# Altium PCB PCBHEXAPOD.PcbDoc
Units mm, origin at the board's own origin, x right, y up, seen from the top; angles counter-clockwise.
Board outline 48.01 x 61.98 mm, 4 copper layers (Top Layer, GND, 12VCC, Bottom Layer), stack 0.603 mm thick; 21 components, 18 nets, 148 pads, 7 vias.
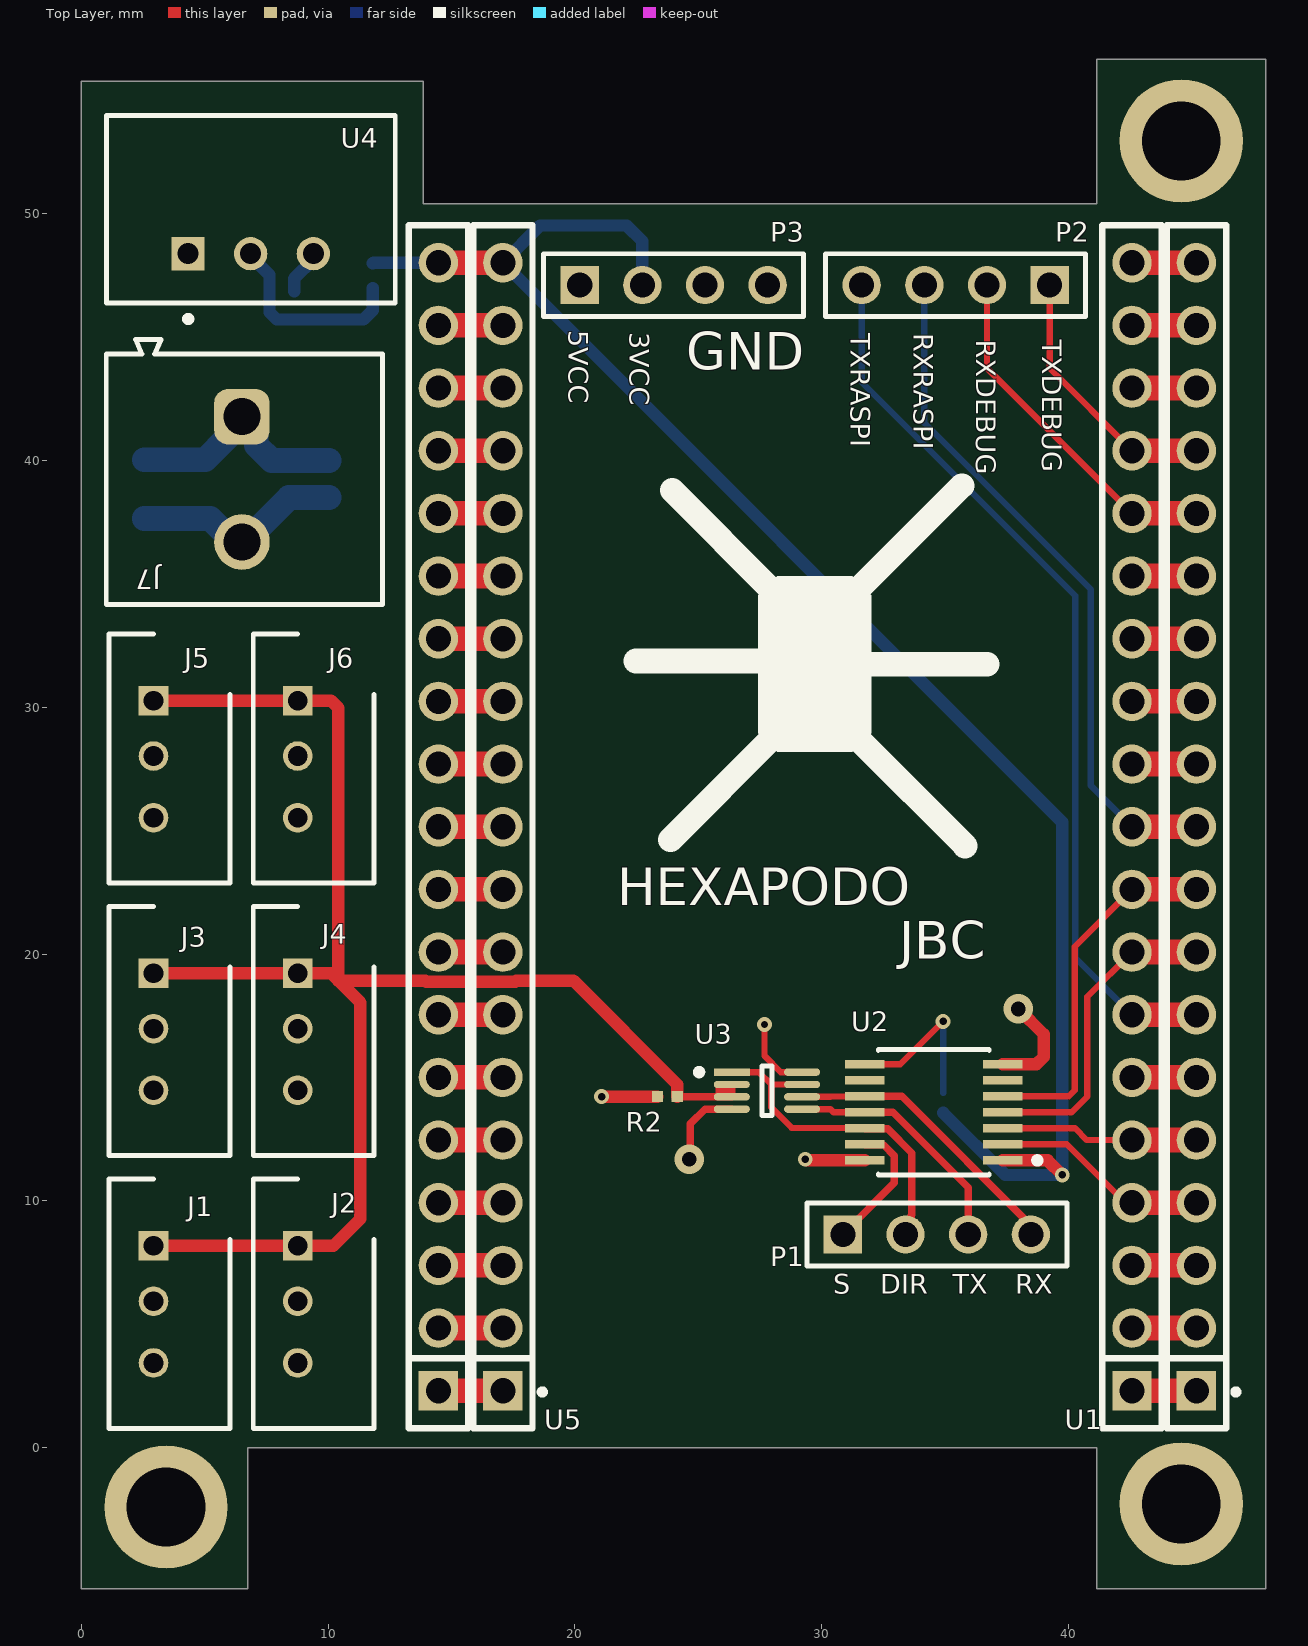
[diagram p0: Top Layer view]
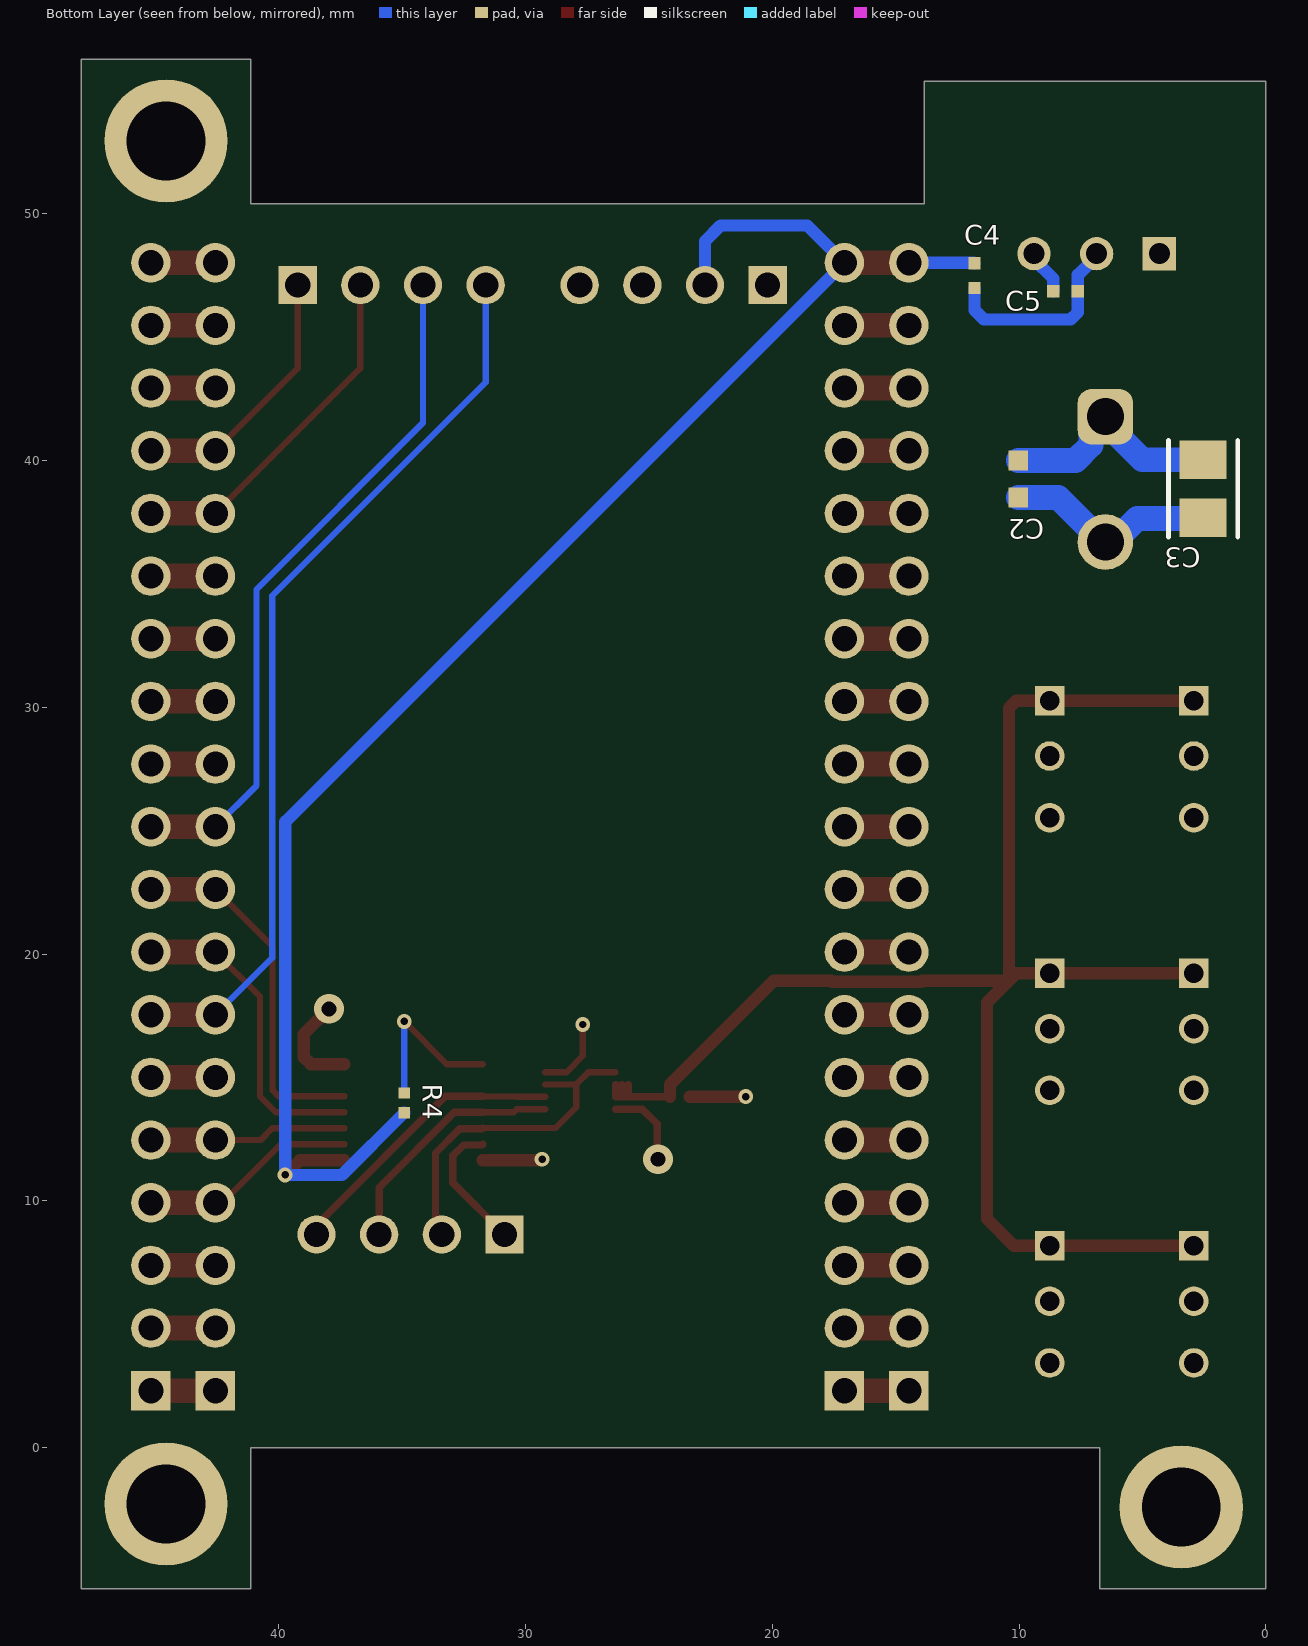
[diagram p1: Bottom Layer view, seen from below]
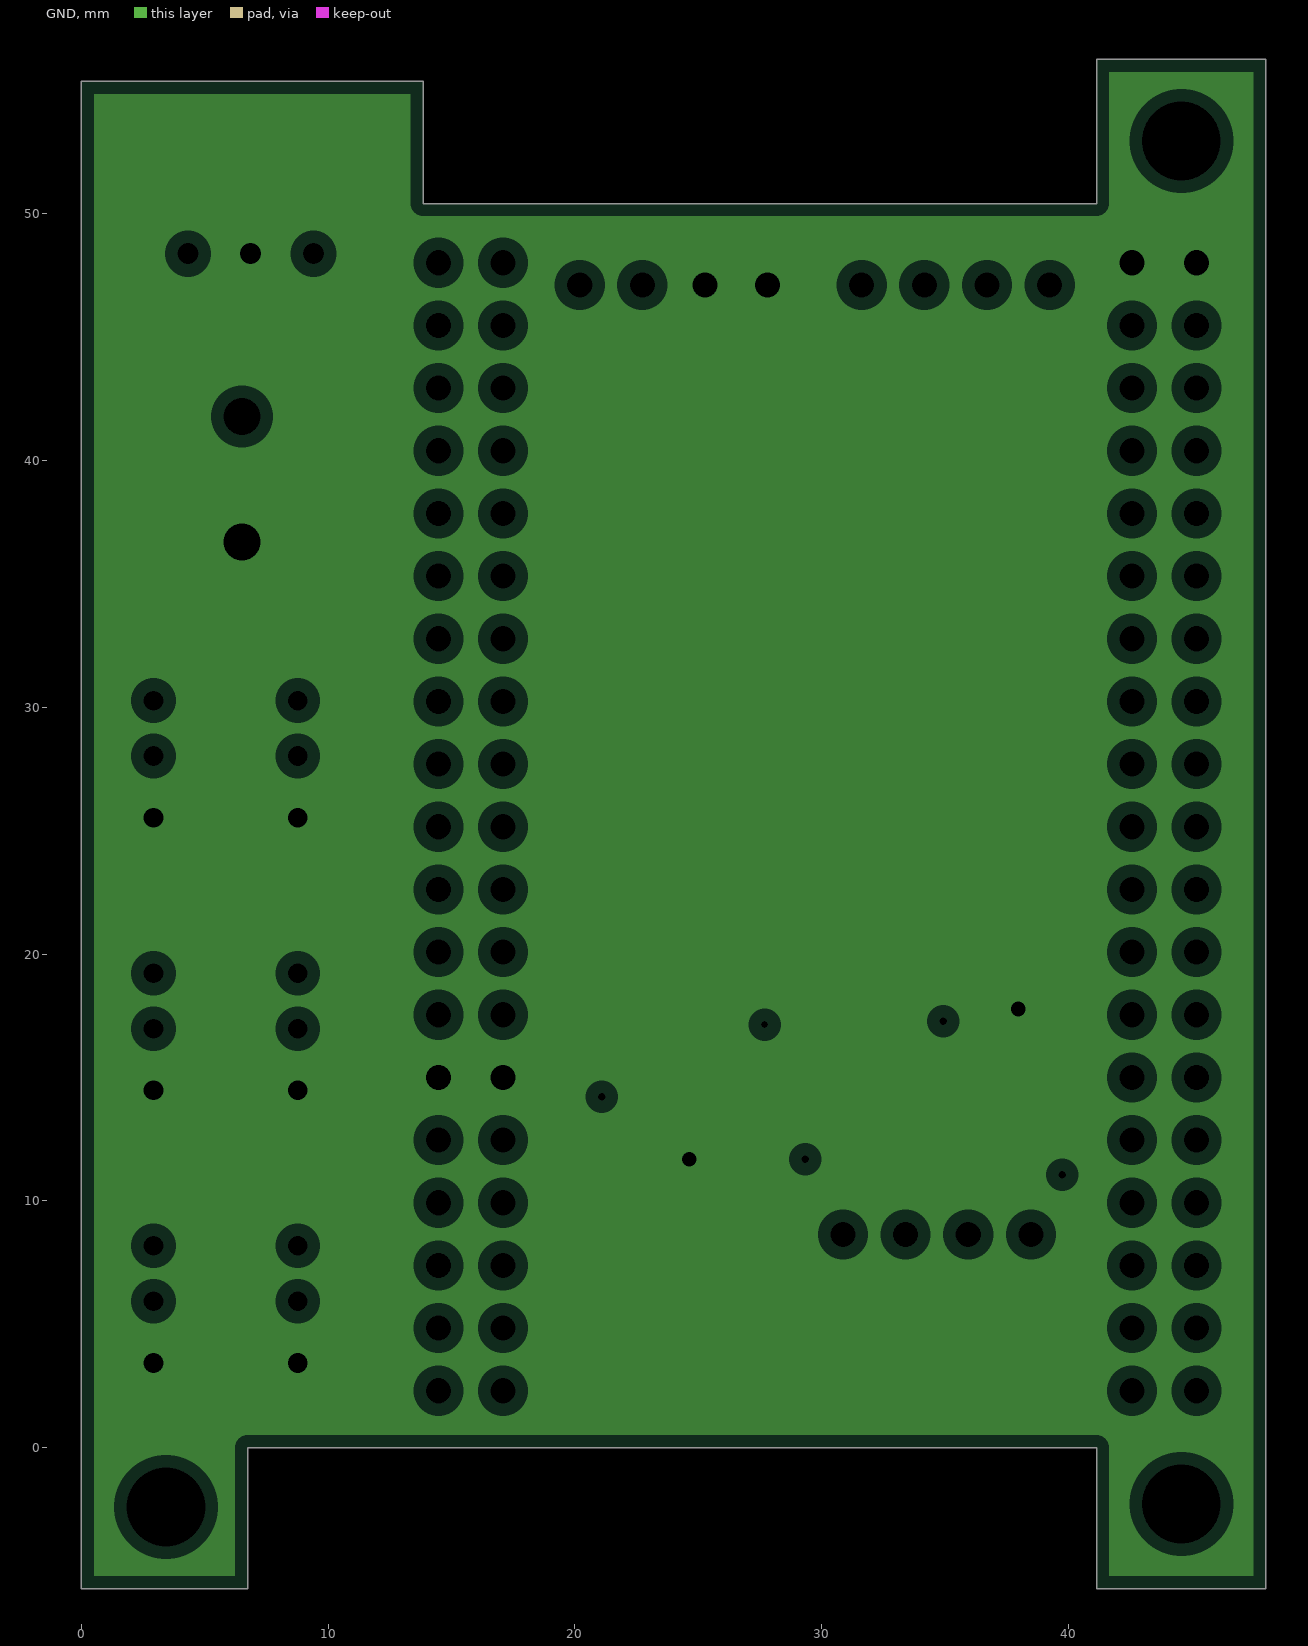
[diagram p2: GND, clearances drawn from the general rule]
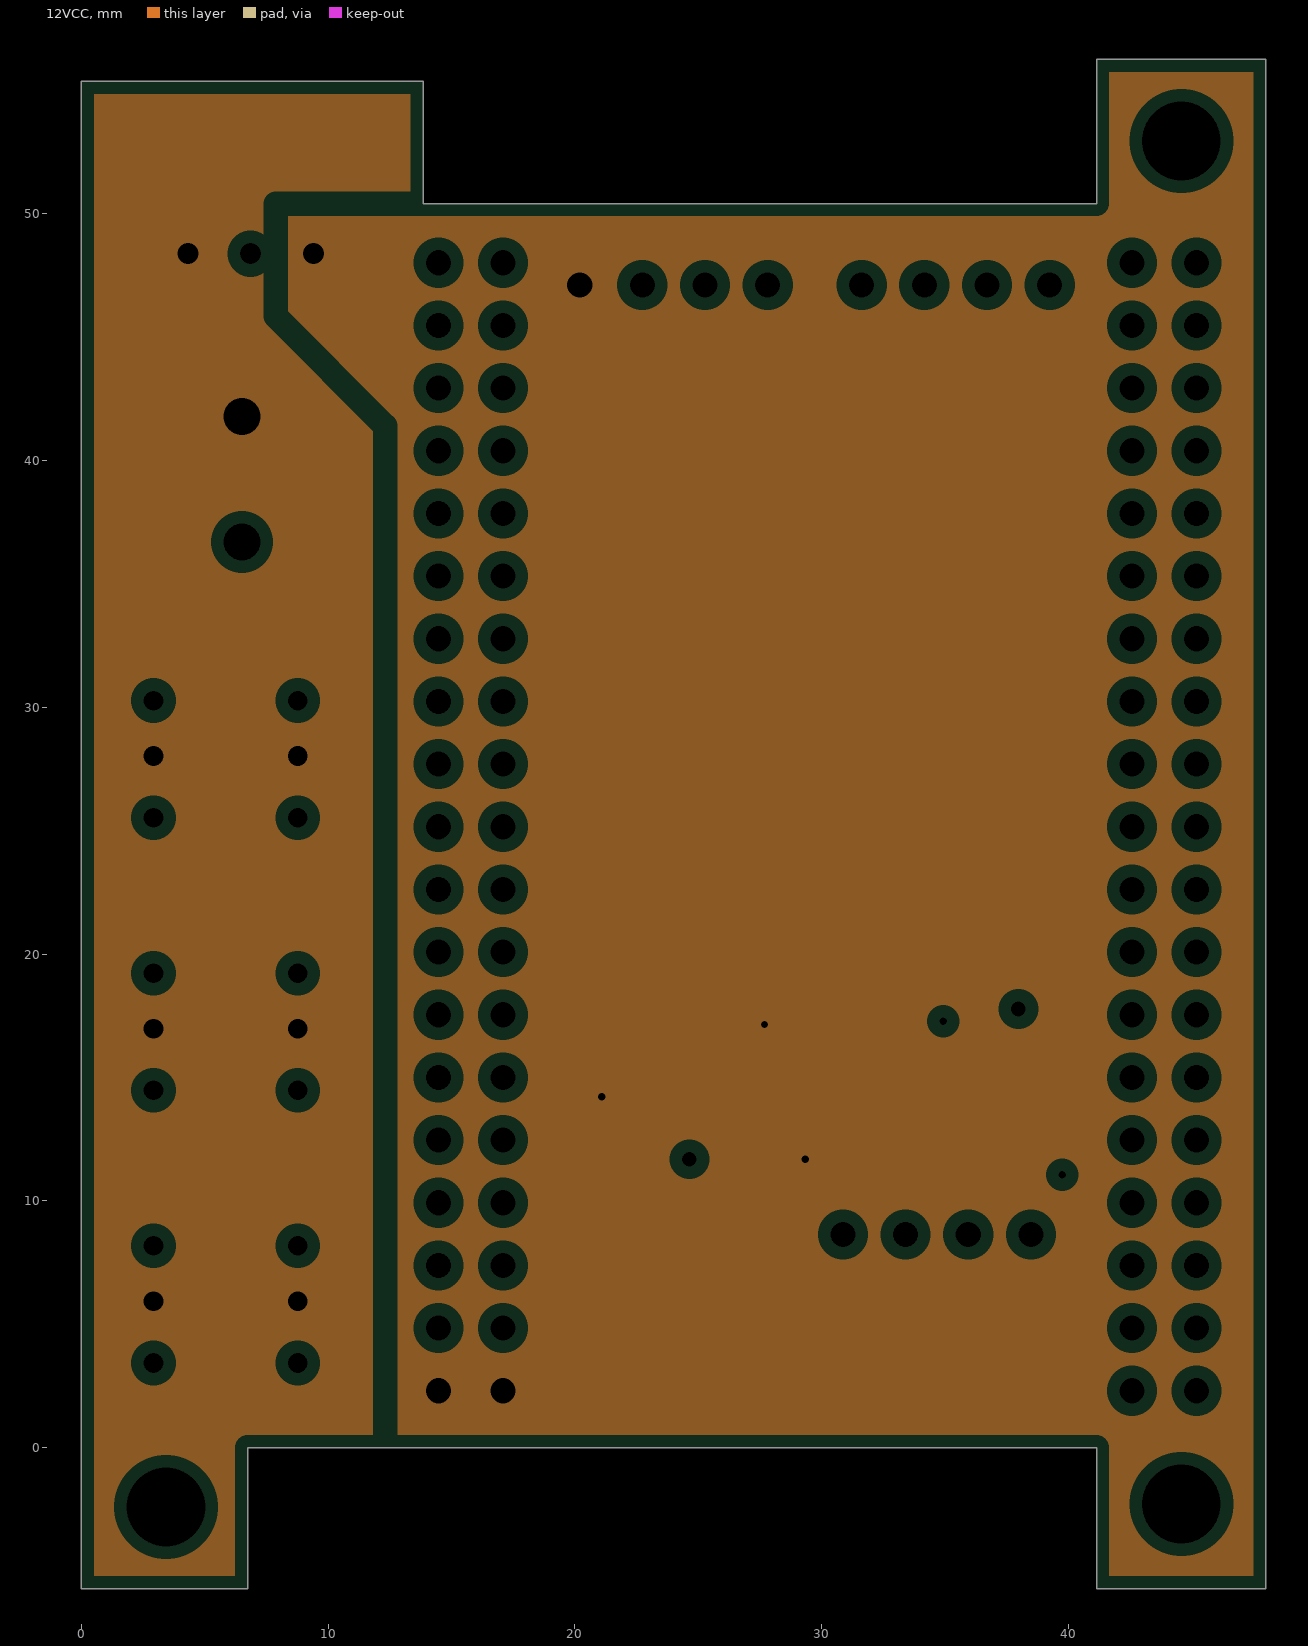
[diagram p3: 12VCC, clearances drawn from the general rule]

## Layer stack, top to bottom
Top Solder: solder mask 0.0102, Solder Resist, Dk 3.5
Top Layer: signal copper 0.0356
Dielectric 2: prepreg 0.0711, PP-006, Dk 4.1
GND: plane copper 0.035, net GND
Dielectric 1: dielectric 0.32, FR-4, Dk 4.8
12VCC: plane copper 0.035, net 5VCC
Dielectric 3: prepreg 0.0711, PP-006, Dk 4.1
Bottom Layer: signal copper 0.0356
Bottom Solder: solder mask 0.0102, Solder Resist, Dk 3.5

## Board outline
0,-5.715 6.731,-5.715 6.731,0 41.148,0 41.148,-5.715 48.006,-5.715 48.006,0 48.006,56.261 41.148,56.261 41.148,50.419 13.843,50.419 13.843,55.372 0,55.372

## Design rules (kind name [scope] priority, off if disabled: settings)
AssemblyTestPointUsage [All] p1: isadvanced=TRUE
AssemblyTestpoint [All] p1: isadvanced=TRUE testpointundercomponent=TRUE minsize=1.016 maxsize=2.54 preferedsize=1.524 minholesize=0 maxholesize=1.016 preferedholesize=0.813 testpointgrid=0.025 usegrid=TRUE gridtolerance=0 allowsidetop=TRUE allowsidebottom=TRUE
Clearance Clearance_1 [OnMid vs InNet('12VCC') And OnMid] p1: gap=0.25 ignorepadtopadclearanceinfootprint=FALSE sourcerule=56 cellrowname=All cellrowtype=0 cellcolname=12VCC cellcoltype=1 innerlayers=TRUE
Clearance Clearance_2 [(ExistsOnLayer('Top Layer') Or ExistsOnLayer('Bottom Layer')) vs InNet('12VCC') And (ExistsOnLayer('Top Layer') Or ExistsOnLayer('Bottom Layer'))] p2: gap=0.25 ignorepadtopadclearanceinfootprint=FALSE sourcerule=56 cellrowname=All cellrowtype=0 cellcolname=12VCC cellcoltype=1 outerlayers=TRUE
Clearance Clearance_3 [ vs InNet('12VCC')] p3: gap=0.254 ignorepadtopadclearanceinfootprint=FALSE sourcerule=56 cellrowname=All cellrowtype=0 cellcolname=12VCC cellcoltype=1
Clearance Clearance_1 [InNet('GND') And OnMid vs OnMid] p4: gap=0.15 ignorepadtopadclearanceinfootprint=FALSE sourcerule=56 cellrowname=GND cellrowtype=1 cellcolname=All cellcoltype=0 innerlayers=TRUE
Clearance Clearance_2 [InNet('GND') And (ExistsOnLayer('Top Layer') Or ExistsOnLayer('Bottom Layer')) vs (ExistsOnLayer('Top Layer') Or ExistsOnLayer('Bottom Layer'))] p5: gap=0.15 ignorepadtopadclearanceinfootprint=FALSE sourcerule=56 cellrowname=GND cellrowtype=1 cellcolname=All cellcoltype=0 outerlayers=TRUE
Clearance Clearance_3 [InNet('GND')] p6: gap=0.254 ignorepadtopadclearanceinfootprint=FALSE sourcerule=56 cellrowname=GND cellrowtype=1 cellcolname=All cellcoltype=0
Clearance Clearance_1 [OnMid vs OnMid] p7: gap=0.15 ignorepadtopadclearanceinfootprint=FALSE sourcerule=56 cellrowname=All cellrowtype=0 cellcolname=All cellcoltype=0 innerlayers=TRUE
Clearance Clearance_2 [(ExistsOnLayer('Top Layer') Or ExistsOnLayer('Bottom Layer')) vs (ExistsOnLayer('Top Layer') Or ExistsOnLayer('Bottom Layer'))] p8: gap=0.15 ignorepadtopadclearanceinfootprint=FALSE sourcerule=56 cellrowname=All cellrowtype=0 cellcolname=All cellcoltype=0 outerlayers=TRUE
Clearance [All] p9: gap=0.254 ignorepadtopadclearanceinfootprint=FALSE ismatrix=TRUE miname0=GND mitype0=1 miname1=12VCC mitype1=1
ComponentClearance [All] p1: isadvanced=TRUE gap=0.254 collisioncheckmode=3 verticalgap=0.254 showdistances=FALSE
FabricationTestPointUsage [All] p1: isadvanced=TRUE valid=0 allowmultiple=FALSE
FabricationTestpoint [All] p1: isadvanced=TRUE side=3 testpointundercomponent=TRUE minsize=1.016 maxsize=2.54 preferedsize=1.524 minholesize=0 maxholesize=1.016 preferedholesize=0.813 testpointgrid=0.025 allowsidetop=TRUE allowsidebottom=TRUE usegrid=TRUE gridtolerance=0
FanoutControl Fanout_BGA [IsBGA] p1: isadvanced=TRUE bgadir=Out bgaviamode=Centered fanoutstyle=Auto fanoutdirection=Alternating viagrid=0.025 // Fanout_BGA (Default Rule)
FanoutControl Fanout_LCC [IsLCC] p2: isadvanced=TRUE bgadir=Out bgaviamode=Centered fanoutstyle=Auto fanoutdirection=Alternating viagrid=0.025 // Fanout_LCC (Default Rule)
FanoutControl Fanout_SOIC [IsSOIC] p3: isadvanced=TRUE bgadir=Out bgaviamode=Centered fanoutstyle=Auto fanoutdirection=Alternating viagrid=0.025 // Fanout_SOIC (Default Rule)
FanoutControl Fanout_Small [(CompPinCount < 5)] p4: isadvanced=TRUE bgadir=Out bgaviamode=Centered fanoutstyle=Auto fanoutdirection=OutThenIn viagrid=0.025 // Fanout_Small (Default Rule)
FanoutControl Fanout_Default [All] p5: isadvanced=TRUE bgadir=Out bgaviamode=Centered fanoutstyle=Auto fanoutdirection=Alternating viagrid=0.025 // Fanout_Default (Default Rule)
Height [All] p1: isadvanced=TRUE minheight=0 maxheight=25.4 prefheight=12.7
HoleSize [All] p1: isadvanced=TRUE absolutevalues=TRUE maxlimit=6.3 minlimit=0.3 maxpercent=80.000 minpercent=20.000
HoleToHoleClearance [All] p1: isadvanced=TRUE gap=0.254 allowstackedmicrovias=TRUE
LayerPairs [All] p1: isadvanced=TRUE enforce=TRUE
MinimumSolderMaskSliver [All] p1: isadvanced=TRUE minsoldermaskwidth=0.1
NetAntennae [All] p1: isadvanced=TRUE netantennaetolerance=0
PasteMaskExpansion [All] p1: isadvanced=TRUE expansion=0
PlaneClearance [All] p1: isadvanced=TRUE clearance=0.508
PlaneConnect [All] p1: isadvanced=TRUE planeconnectstyle=Relief reliefexpansion=0.508 reliefentries=4 reliefconductorwidth=0.254 reliefairgap=0.254
PolygonConnect "Schematic Polygon Connect Style_1" [InNet('12VCC')] p1: connectstyle=Direct reliefconductorwidth=0.254 reliefentries=4 polygonreliefangle="90 Angle" airgapwidth=0.254
PolygonConnect "Schematic Polygon Connect Style" [InNet('GND')] p2: connectstyle=Direct reliefconductorwidth=0.254 reliefentries=4 polygonreliefangle="90 Angle" airgapwidth=0.254
PolygonConnect [All] p3: connectstyle=Relief reliefconductorwidth=0.254 reliefentries=4 polygonreliefangle="90 Angle" airgapwidth=0.254
RoutingCorners [All] p1: isadvanced=TRUE cornerstyle=45-Degree minsetback=2.54 maxsetback=2.54
RoutingPriority [All] p1: isadvanced=TRUE routingpriority=0
RoutingVias "Schematic Routing Via Style" [InNet('12VCC')] p1: holewidth=0.6 width=1.2 viastyle="Through Hole" minholewidth=0.6 minwidth=1.2 maxholewidth=0.6 maxwidth=1.2
RoutingVias "Schematic Routing Via Style_1" [InNet('GND')] p2: holewidth=0.6 width=1.2 viastyle="Through Hole" minholewidth=0.6 minwidth=1.2 maxholewidth=0.6 maxwidth=1.2
RoutingVias [All] p3: holewidth=0.3 width=0.6 viastyle="Through Hole" minholewidth=0.3 minwidth=0.6 maxholewidth=0.3 maxwidth=0.6
ShortCircuit [All] p1: isadvanced=TRUE allowed=FALSE
SilkToSilkClearance [All] p1: isadvanced=TRUE silktosilkclearance=0.1
SilkToSolderMaskClearance [IsPad] p1: isadvanced=TRUE minsilkscreentomaskgap=0.15 clearancetoexposedcopper=TRUE
SolderMaskExpansion [All] p1: isadvanced=TRUE expansion=0.102 istentingtop=FALSE
SupplyNets "Schematic Supply Nets_3" [InNet('3VCC')] p1: isadvanced=TRUE voltage=0.000
SupplyNets "Schematic Supply Nets_2" [InNet('12VCC')] p2: isadvanced=TRUE voltage=0.000
SupplyNets "Schematic Supply Nets_1" [InNet('5VCC')] p3: isadvanced=TRUE voltage=0.000
SupplyNets "Schematic Supply Nets" [InNet('GND')] p4: isadvanced=TRUE voltage=0.000
UnRoutedNet [All] p1: isadvanced=TRUE
UnpouredPolygon [All] p1: isadvanced=TRUE
Width "Schematic Width Constraint_5" [InNet('12VCC')] p1: maxlimit=5 minlimit=0.5 preferedwidth=1 minimp=50.000000 maximp=50.000000 favimp=50.000000
Width "Schematic Width Constraint_4" [InNet('GND')] p2: maxlimit=5 minlimit=0.3 preferedwidth=1 minimp=50.000000 maximp=50.000000 favimp=50.000000
Width "Schematic Width Constraint_2" [InNet('DATOS')] p3: maxlimit=5 minlimit=0.15 preferedwidth=0.5 minimp=50.000000 maximp=50.000000 favimp=50.000000
Width "Schematic Width Constraint_1" [InNet('5VCC')] p4: maxlimit=5 minlimit=0.254 preferedwidth=0.5 minimp=50.000000 maximp=50.000000 favimp=50.000000
Width "Schematic Width Constraint" [InNet('3VCC')] p5: maxlimit=5 minlimit=0.3 preferedwidth=0.5 minimp=50.000000 maximp=50.000000 favimp=50.000000
Width "Schematic Width Constraint_3" [InNetClass('POWER')] p6: maxlimit=5 minlimit=0.5 preferedwidth=1 minimp=50.000000 maximp=50.000000 favimp=50.000000
Width [All] p7: maxlimit=5 minlimit=0.15 preferedwidth=0.254 minimp=50.000000 maximp=50.000000 favimp=50.000000
4 further rules are at their usual default settings.

## Classes and differential pairs
net class POWER: 3VCC 5VCC 12VCC GND

## Components (designator, comment, footprint, x,y, rotation, side; value= is the part's Value field where it differs from the comment)
C2 "885012206076" WCAP-CSGP_0603_L1.6W0.8H0.8_Reflow 10.033,39.255 r90 bottom
C3 "GCJ31CD7YA106KE02L" FP-GCJ31C-0_4-IPC_C 2.54,38.862 r270 bottom
C4 "885012205037R" WCAP-CSGP_0402_L1W0.5H0.5 11.811,47.498 r90 bottom
C5 "885012205037R" WCAP-CSGP_0402_L1W0.5H0.5 8.12,46.863 r180 bottom
J1 "22-03-5035" SHDR3W60P0X250_1X3_990X490X590P 2.921,8.429 r90 top
J2 "22-03-5035" SHDR3W60P0X250_1X3_990X490X590P 8.763,8.429 r90 top
J3 "22-03-5035" SHDR3W60P0X250_1X3_990X490X590P 2.921,19.478 r90 top
J4 "22-03-5035" SHDR3W60P0X250_1X3_990X490X590P 8.763,19.478 r90 top
J5 "22-03-5035" SHDR3W60P0X250_1X3_990X490X590P 2.921,30.527 r90 top
J6 "22-03-5035" SHDR3W60P0X250_1X3_990X490X590P 8.763,30.527 r90 top
J7 "691253510002" 691253510002 6.604,39.243 r270 top
P1 "TSW-104-08-L-S" SMTC-TSW-104-08-X-S 30.861,8.636 r0 top
P2 "TSW-104-08-L-S" SMTC-TSW-104-08-X-S 39.243,47.117 r180 top
P3 "TSW-104-08-L-S" SMTC-TSW-104-08-X-S 20.193,47.117 r0 top
R2 "ERJ2RKF1002X" RESC1005X40X25LL05T05 23.749,14.224 r180 top
R4 "ERJ2RKF1002X" RESC1005X40X25LL05T05 34.925,13.97 r270 bottom
U1 "SSW-119-01-T-S" HDR-TH_ESW-119-37-S-S 45.374,25.163 r90 top
U2 "TXB0104PWR" Texas_Instruments_PW0014A_MFG 34.544,13.589 r180 top
U3 "SN74LVC2G241DCUT" FP-DCU0008A-IPC_A 27.784,14.466 r0 top
U4 "TSR 1-2450" TRACO-SIP-3_V 6.858,48.387 r0 top
U5 "SSW-119-01-T-S" HDR-TH_ESW-119-37-S-S 17.264,25.163 r90 top

## Footprints (in the part's own frame and the unit in brackets; to place one, negate y for a bottom-side part, rotate by r counter-clockwise, add the part's x,y. Pads: shape width x height; smd on the part's side, far side on the other; paste and mask are expansions set on the pad)
691253510002 [mm] "Serie 2535 - 5.08 mm _ 2 pins"
  rrect50% 2.25x2.25 hole 1.5: 1(-2.54,-0.1)
  round 2.25 hole 1.5: 2(2.54,-0.1)
  silkscreen extent -5.67,-5.6 5.08,5.6, body extent -5.67,-5.6 5.09,5.6, height 18.1
FP-DCU0008A-IPC_A [mm]
  rect 1.46x0.297 smd paste+0 mask+0: 1(-1.426,0.75)
  rrect100% 1.46x0.297 smd paste+0 mask+0: 2(-1.426,0.25) 3(-1.426,-0.25) 4(-1.426,-0.75) 5(1.426,-0.75) 6(1.426,-0.25) 7(1.426,0.25) 8(1.426,0.75)
  silkscreen extent -2.87,-1 0.2,1, body extent -2.66,-1.5 2.66,1.5, height 0.25
FP-GCJ31C-0_4-IPC_C [mm]
  rect 1.553x1.903 smd paste+0 mask+0: 1(-1.175,0) 2(1.175,0)
  silkscreen extent -1.95,-1.4 1.95,1.4, body extent -1.6,-0.8 1.6,0.8, height 2
HDR-TH_ESW-119-37-S-S [mm]
  rect 1.6x1.6 hole 1.02 paste-2539.97 mask+0.05: 1(-22.86,0.184) 1(-22.86,2.794)
  round 1.6 hole 1.02 paste-2539.97 mask+0.05: 2(-20.32,0.184) 2(-20.32,2.794) 3(-17.78,0.184) 3(-17.78,2.794) 4(-15.24,0.184) 4(-15.24,2.794) 5(-12.7,0.184) 5(-12.7,2.794) 6(-10.16,0.184) 6(-10.16,2.794) 7(-7.62,0.184) 7(-7.62,2.794) 8(-5.08,0.184) 8(-5.08,2.794) 9(-2.54,0.184) 9(-2.54,2.794) 10(0,2.794) 10(0,0.184) 11(2.54,0.184) 11(2.54,2.794) 12(5.08,0.184) 12(5.08,2.794) 13(7.62,0.184) 13(7.62,2.794) 14(10.16,0.184) 14(10.16,2.794) 15(12.7,0.184) 15(12.7,2.794) 16(15.24,0.184) 16(15.24,2.794) 17(17.78,0.184) 17(17.78,2.794) 18(20.32,0.184) 18(20.32,2.794) 19(22.86,0.184) 19(22.86,2.794)
  Top Layer lines w1: -22.86,2.794 -22.86,0.184 ; -20.32,2.794 -20.32,0.184 ; -17.78,2.794 -17.78,0.184 ; -15.24,2.794 -15.24,0.184 ; -12.7,2.794 -12.7,0.184 ; -10.16,2.794 -10.16,0.184 ; -7.62,2.794 -7.62,0.184 ; -5.08,2.794 -5.08,0.184 ; -2.54,2.794 -2.54,0.184 ; 0,2.794 0,0.184 ; 2.54,2.794 2.54,0.184 ; 5.08,2.794 5.08,0.184 ; 7.62,2.794 7.62,0.184 ; 10.16,2.794 10.16,0.184 ; 12.7,2.794 12.7,0.184 ; 15.24,2.794 15.24,0.184 ; 17.78,2.794 17.78,0.184 ; 20.32,2.794 20.32,0.184 ; 22.86,2.794 22.86,0.184
  silkscreen extent -24.38,-1.52 24.38,4, body extent -23.88,-1.14 24.38,4.01, height 8.5
RESC1005X40X25LL05T05 [mm] "Chip Resistor, 2-Leads, Body 1.05x0.55mm, IPC High Density"
  rect 0.45x0.45 smd: 1(-0.4,0) 2(0.4,0)
  body extent -0.53,-0.28 0.53,0.28, height 0.4
SHDR3W60P0X250_1X3_990X490X590P [mm]
  rect 1.2x1.2 / inner round 1.2 / far side rect 1.2x1.2 hole 0.8: 1(-0.254,0)
  round 1.2 hole 0.8: 2(-2.5,0) 3(-5,0)
  silkscreen extent -7.65,-3.1 2.45,1.8, body extent -7.7,-3.1 2.2,1.8, height 5.8
SMTC-TSW-104-08-X-S [mm] ".025 SQ Post Terminal Strip Assembly, 1x4 Pins, Vertical, 2.54mm Pitch, Male"
  rect 1.55x1.55 hole 1.02: 1(0,0)
  round 1.55 hole 1.02: 2(2.54,0) 3(5.08,0) 4(7.62,0)
  silkscreen extent -1.46,-1.27 9.08,1.27, body extent -1.27,-1.27 8.89,1.27, height 8.38
Texas_Instruments_PW0014A_MFG [mm]
  rect 1.6x0.35 smd paste-1000 mask+0: 1(-2.8,1.95) 2(-2.8,1.3) 3(-2.8,0.65) 4(-2.8,0) 5(-2.8,-0.65) 6(-2.8,-1.3) 7(-2.8,-1.95) 8(2.8,-1.95) 9(2.8,-1.3) 10(2.8,-0.65) 11(2.8,0) 12(2.8,0.65) 13(2.8,1.3) 14(2.8,1.95)
  silkscreen extent -4.33,-2.55 2.25,2.55, body extent -3.7,-2.8 3.7,2.8, height 0.25
TRACO-SIP-3_V [mm] "SIP, 3-Leads, Body 11.7x7.6mm, Pitch 2.54mm"
  rect 1.35x1.35 hole 0.85 paste-2539.97: 1(-2.54,0)
  round 1.35 hole 0.85 paste-2539.97: 2(0,0) 3(2.54,0)
  silkscreen extent -5.84,-2.77 5.86,5.6, body extent -5.84,-2 5.86,5.6, height 10.2
WCAP-CSGP_0402_L1W0.5H0.5 [mm] "Ceramic Capacitors, body 1x0.5mm"
  rect 0.5x0.5 smd: 1(-0.5,0) 2(0.5,0)
  body extent -0.5,-0.25 0.5,0.25, height 0.5
WCAP-CSGP_0603_L1.6W0.8H0.8_Reflow [mm] "Ceramic Capacitors, body 1.6x0.8mm"
  rect 0.8x0.8 smd: 1(-0.75,0) 2(0.75,0)
  body extent -0.8,-0.4 0.8,0.4, height 0.8

## Part data
C2: library part CMP-03913-53914785-2, "1UF Multilayer Ceramic Capacitor Mlcc 25 V , X7R Dielectric 0603 Surface Mount", Capacitance=1µF, Case Code (Imperial)=0603, Case Code (Metric)=1608, Dielectric=X7R, Insulation Resistance=500MΩ, Max Operating Temperature=125°C, Min Operating Temperature=-55°C, Tolerance=10%, Voltage Rating=25V, Case/Package=0603, Height=800µm, Length=1.6mm, Material=Ceramic, Mount="Surface Mount", REACH SVHC=Unknown, RoHS=Compliant, Thickness=939.8µm, Voltage Rating (DC)=25V, Width=800µm
C3: library part CMP-06035-004889-1, "Cap Ceramic 10uF 35V X7T 10% SMD 1206 +125°C Embossed Plastic T/R"
C4 C5: library part CMP-03913-130590225-1, "Cap, 0.1Uf, 16V, Mlcc, 0402 Rohs Compliant: Yes", Capacitance=100nF, Insulation Resistance=5GΩ, Max Operating Temperature=125°C, Min Operating Temperature=-55°C, Voltage Rating=16V, Height=500µm, Length=1mm, RoHS=Compliant, Width=500µm
J1 J2 J3 J4 J5 J6: "Header 2.5mm SPOX,WTB,vert, shrouded, 3w Molex SPOX Series, Series Number 5267, 2.5mm Pitch 3 Way 1 Row Straight PCB Header, Solder Termination, 3A", Manufacturer_Name=Molex, Mouser Part Number=538-22-03-5035, Datasheet Link=http://www.molex.com/pdm_docs/sd/022035035_sd.pdf, Geometry.Height=5.9mm, Manufacturer_Part_Number=22-03-5035, Mouser Price/Stock=https://www.mouser.co.uk/ProductDetail/Molex/22-03-5035?qs=VKrXD49J9Ep%252Bv2WwbOoiPA%3D%3D
J7: library part CMP-1502-02670-3, "Terminal Block, Wtb, 2Way, 30-12Awg Rohs Compliant: Yes", Current Rating=16A, Max Operating Temperature=120°C, Min Operating Temperature=-30°C, Voltage Rating=300V, Contact Material="Nickel, Tin", Height=18.1mm, Number Of Contacts=2, Number of Rows=1, RoHS=Compliant
P1 P2 P3: library part CMP-1024-00358-1, "0.025\" SQ Post Header, Through-hole, Vertical, -55 to 125 degC, 2.54 mm Pitch, 4-Pin, Male, RoHS", Manufacturer=Samtec, Temperature Range="-55 to 125 degC", ComponentLink1Description="Manufacturer URL", ComponentLink1URL=http://www.samtec.com, ComponentLink2Description=Datasheet, ComponentLink2URL=http://www.samtec.com/documents/webfiles/pdf/TSW_TH.PDF, ComponentLink3Description="Package Specification", ComponentLink3URL=http://www.samtec.com/documents/webfiles/cpdf/TSW-XXX-XX-XXX-X-XX-XXX-MKT.pdf, DatasheetVersion=F-214, Mounting Technology=Through-hole, Orientation=Vertical, PackageDescription=".025[0.64] SQ. Post Terminal Strip Assembly", PackageReference=TSW-104-08-X-S, PackageVersion="DM, 8/1988", PartNumber=TSW-104-08-L-S, Pitch="2.54 mm", RoHS=True
R2 R4: library part CMP-2000-07588-1, "Chip Resistor, 10 KOhm, +/- 1%, 0.1 W, -55 to 155 degC, 0402 (1005 Metric), RoHS, Tape and Reel", Case Code (Imperial)=0402, Case Code (Metric)=1005, Manufacturer=Panasonic, Max Operating Temperature=155degC, Max Power Dissipation=100mW, Min Operating Temperature=-55degC, Package Description="2-Pin Surface Mount Device, Body 1 x 0.5 mm", Package Quantity=1, Package Reference=402, Resistance=10KOhm, Temperature Coefficient=100ppm\/degreesC, Tolerance=1%, Voltage Rating=50V, Case\/Package=0402, Composition=ThickFilm, Contact Plating=Tin, Datasheet URL=https://industrial.panasonic.com/cdbs/www-data/pdf/RDA0000/AOA0000C304.pdf, Datasheet Version=02/2017, Depth=0.5mm, Height=0.35mm, Lead Free=LeadFree, Length=1mm, Manufacturer URL=http://www.panasonic.com/, Military Standard=Not, Mount=SurfaceMount, Mounting Technology=SurfaceMount, Number of Pins=2, Number of Terminations=2, Packaging=TapeandReel, Power Rating=100mW, Radiation Hardening=No, REACH SVHC=NoSVHC, RoHSCompliant=True, Termination=SMD/SMT, Voltage Rating (DC)=50V, Width=0.02inch
U2: library part CMP-2000-07335-2, Ambient Temperature Range High=85°C, Case/Package=TSSOP, High Level Output Current=-20µA, Low Level Output Current=20µA, Manufacturer Lifecycle Status=ACTIVE, Max Junction Temperature (Tj)=150°C, Max Supply Voltage=5.5V, Min Operating Temperature=-40°C, Min Supply Voltage=1.2V, Nominal Supply Current=5µA, Quiescent Current=3.5µA, Data Rate=100Mbps, Height=1.2mm, Lead Free="Lead Free", Length=5mm, Lifecycle Status=Production, Logic Function=Translator, Max Operating Temperature=85°C, Min Supply Voltage (DC)=1.2V, Mount="Surface Mount", NexarPartId=1486292, Number of Bits=4, Number of Channels=4, Number of Circuits=1, Number of Inputs=4, Number of Outputs=4, Number of Pins=14, Output Current=20µA, Packaging=Digi-Reel®, Propagation Delay=4ns, Radiation Hardening=No, REACH SVHC="No SVHC", Rise Time=700ps, RoHS=Compliant, Schedule B="8542390000, 8542390000", Thickness=1mm, Turn-On Delay Time=31ns, Weight=57.209338mg, Width=4.4mm
U3: library part CMP-0859-00583-4, "IC BUFFER NON-INVERT 5.5V US8", Case/Package=VSSOP, High Level Output Current=-32mA, Low Level Output Current=32mA, Max Operating Temperature=125°C, Max Supply Voltage=5.5V, Min Operating Temperature=-40°C, Min Supply Voltage=1.65V, Package Quantity=250, Quiescent Current=10uA, Contact Plating=Gold, Lead Free="Lead Free", Logic Function=Buffer, Mount="Surface Mount", Number of Bits=2, Number of Bits per Element=1, Number of Channels=2, Number of Elements=2, Number of Gates=2, Number of Input Lines=2, Number of Inputs=2, Number of Output Lines=2, Number of Outputs=2, Number of Pins=8, Output Type=3-STATE, Packaging="Tape and Reel", Polarity=Non-Inverting, Propagation Delay=3.7ns, Radiation Hardening=No, REACH SVHC="No SVHC", RoHS Compliant=Yes, Series=74LVC, Technology=CMOS, Termination=SMD/SMT, Turn-On Delay Time=12.5ns
U4: library part CMP-2000-05427-1, "DC/DC converter, 5 VDC, 1000 mA, -40 to 85 degC, 3-Pin SIP, RoHS", Input Voltage DC Max=36V, Input Voltage DC Min=6.5V, Manufacturer=Tracopower, Output Current Max=1A, Output Power Max=5W, Output Voltage Nom.=5V, Package Description="3-Pin Single In-line Package, Body 11.7 x 7.6 mm, Pitch 2.54 mm", Package Reference=SIP-3, Approvals & Standards=IEC,UL, Datasheet URL=https://datasheet.ciiva.com/6815/tsr1-6815641.pdf, Datasheet Version=Jan-15, DC / DC Converter Mounting=ThroughHole, DC / DC Converter Output Type=Fixed, DC / DC Converter Type=SIP, Depth=11.7mm, Height=10.2mm, Manufacturer URL=http://www.tracopower.com/home, No. of Outputs=1Output, Product Range=TSR-1Series, Width=7.6mm

## Free pads (board coordinates)
  round 5 hole 3.2: 6(3.429,-2.413) 6(44.577,-2.286) 6(44.577,52.959)

## Via types
v1: diameter 0.6, hole 0.3, Top Layer to Bottom Layer, 5 vias
v2: diameter 1.2, hole 0.6, Top Layer to Bottom Layer, 2 vias

## Nets (pads, with @x,y where several pads share a name; then routed paths per layer and width w, separated by ;. In a path a pad name is that pad's centre, name@x,y a point inside that pad or via, vN(x,y) a via of type N, cw(c..) or ccw(c..) an arc to the next point about the centre after c; other vN are vias at no path point)
3VCC: C4.2 P3.2 R4.2 U2.1 U5.19 | length 65.9
  Top Layer w0.5: U2.1 39.161,11.639 v1(39.751,11.049)
  Bottom Layer w0.5: C4.2 11.836,48.023 U5.19@14.47,48.023 ; P3.2 22.733,48.895 22.098,49.53 18.587,49.53 17.08,48.023 39.605,25.499 39.751,25.352 v1(39.751,11.049) 37.446,11.049 R4.2
5VCC: C5.1 P3.1 R2.2 U2.14 U3.8 U4.3 U5.1 | length 9.6
  Top Layer w0.254: v1(27.686,17.145) 27.686,15.875 28.345,15.216 U3.8
  Top Layer w0.5: v1(21.082,14.224) R2.2 ; v1(29.337,11.684) 29.364,11.684 29.409,11.639 U2.14
  Bottom Layer w0.5: C5.1 8.62,47.379 9.398,48.157 U4.3
12VCC: C2.2 C3.1 J1.2 J2.2 J3.2 J4.2 J5.2 J6.2 J7.1 U4.1 | length 9.6
  Bottom Layer w1: C3.1 5.009,40.037 5.918,40.945 5.918,41.197 J7.1 ; J7.1@6.22,41.499 6.754,41.499 7.09,41.163 7.09,40.629 7.715,40.005 C2.2
DATOS: J1.1 J2.1 J3.1 J4.1 J5.1 J6.1 R2.1 U3.2 U3.3 | length 64.8
  Top Layer w0.3: R2.1 U3.3@26.289,14.224 ; U3.3@25.85,14.216 U3.2@25.85,14.716 ; U3.3@26.104,14.216 U3.2@26.104,14.716 ; U3.3 U3.2
  Top Layer w0.5: J1.1 J2.1 10.207,8.175 11.303,9.271 11.303,18.034 10.414,18.923 ; J3.1 J4.1 10.113,19.224 10.414,18.923 ; J5.1 J6.1 10.113,30.273 10.414,29.972 10.414,18.923 ; R2.1 24.149,14.713 19.939,18.923 17.617,18.923 17.577,18.883 13.973,18.883 13.933,18.923 10.414,18.923
DIR3V3: U1.5 U2.3 | length 5.4
  Top Layer w0.254: U2.3 40.274,12.939 40.75,12.463 U1.5@42.58,12.463
DIR5V5: P1.2 U2.12 U3.1 U3.7 | length 13.9
  Top Layer w0.254: U3.1 27.456,15.216 27.954,14.718 ; U3.7 27.956,14.716 27.954,14.718 ; U2.12 U2.12@31.792,12.891 ; U2.12@31.744,12.954 28.789,12.954 27.954,13.789 27.954,14.718
  Top Layer w0.3: U2.12 31.769,12.914 32.679,12.914 33.655,11.938 33.655,9.437 33.64,9.422 33.64,8.875 P1.2
GND: C2.1 C3.2 C4.1 C5.2 J1.3 J2.3 J3.3 J4.3 J5.3 J6.3 J7.2 P3.3 P3.4 U1.19 U2.7 U3.4 U4.2 U5.6 | length 24.2
  Top Layer w0.3: v2(24.638,11.684) 24.676,11.722 24.676,13.119 25.273,13.716 U3.4
  Top Layer w0.5: U2.7 38.709,15.539 39.002,15.832 39.002,16.751 v2(37.973,17.78)
  Bottom Layer w0.5: U4.2 6.858,48.292 7.62,47.53 7.62,46.013 7.913,45.72 11.43,45.72 11.811,46.101 C4.1
  Bottom Layer w1: C3.2@2.54,37.654 5.214,37.654 6.166,36.703 J7.2 6.612,36.703 8.414,38.505 C2.1
NetR4_1: R4.1 U2.8 | length 6.8
  Top Layer w0.254: U2.8 33.192,15.539 v1(34.925,17.272)
  Bottom Layer w0.254: R4.1 v1(34.925,17.272)
RX3V3: U1.9 U2.5 | length 12.1
  Top Layer w0.254: U2.5 40.02,14.239 40.259,14.478 40.259,20.302 U1.9@42.58,22.623
RX5V5: P1.4 U2.10 U3.6 | length 11.8
  Top Layer w0.254: U3.6 29.214,14.22 30.349,14.22 30.361,14.232 31.737,14.232 U2.10
  Top Layer w0.3: U2.10 33.259,14.239 38.481,9.017 P1.4
RXDEBUG: P2.2 U1.15 | length 11.7
  Top Layer w0.254: P2.2 36.703,43.74 U1.15@42.58,37.863
RXRASPI: P2.3 U1.10 | length 25.4
  Bottom Layer w0.254: P2.3 34.163,41.529 40.91,34.782 40.91,26.833 U1.10@42.58,25.163
SEÑAL3V3: U1.4 U2.2 | length 6.2
  Top Layer w0.254: U2.2 39.933,12.289 42.299,9.923 U1.4@42.58,9.923
SEÑAL5V5: P1.1 U2.13 | length 5.5
  Top Layer w0.3: P1.1 32.951,10.726 32.951,11.831 32.518,12.264 31.769,12.264 U2.13
TX3V3: U1.8 U2.4 | length 10.3
  Top Layer w0.254: U2.4 40.132,13.589 40.767,14.224 40.767,18.27 U1.8@42.58,20.083
TX5V5: P1.3 U2.11 U3.5 | length 10
  Top Layer w0.254: U3.5 29.218,13.708 30.361,13.708 30.48,13.589 U2.11
  Top Layer w0.3: U2.11 32.893,13.589 35.941,10.541 P1.3
TXDEBUG: P2.1 U1.16 | length 8.1
  Top Layer w0.254: P2.1 39.243,43.74 U1.16@42.58,40.403
TXRASPI: P2.4 U1.7 | length 34.1
  Bottom Layer w0.254: P2.4 31.623,43.18 40.278,34.525 40.278,19.845 U1.7@42.58,17.543
pads on no net: U1.1 U1.2 U1.3 U1.6 U1.11 U1.12 U1.13 U1.14 U1.17 U1.18 U2.6 U2.9 U5.2 U5.3 U5.4 U5.5 U5.7 U5.8 U5.9 U5.10 U5.11 U5.12 U5.13 U5.14 U5.15 U5.16 U5.17 U5.18

## Polygon pours and split planes (outlines as drawn)
GND on GND (split plane): 47.496,0 47.496,-5.205 41.658,-5.205 41.658,0 41.649,0.1 41.62,0.195 41.572,0.284 41.509,0.361 41.432,0.424 41.343,0.472 41.248,0.501 41.148,0.51 6.731,0.51 6.631,0.501 6.536,0.472 6.447,0.424 6.37,0.361 6.307,0.284 6.259,0.195 6.23,0.1 6.221,0 6.221,-5.205 0.51,-5.205 0.51,54.862 13.333,54.862 13.333,50.419 13.342,50.319 13.371,50.224 13.419,50.135 13.482,50.058 13.559,49.995 13.648,49.947 13.743,49.918 13.843,49.909 41.148,49.909 41.248,49.918 41.343,49.947 41.432,49.995 41.509,50.058 41.572,50.135 41.62,50.224 41.649,50.319 41.658,50.419 41.658,55.751 47.496,55.751
12VCC on 12VCC (split plane): 13.333,50.921 7.874,50.921 7.776,50.912 7.682,50.883 7.595,50.837 7.519,50.774 7.456,50.698 7.41,50.611 7.381,50.517 7.372,50.419 7.372,45.847 7.381,45.749 7.41,45.655 7.456,45.568 7.519,45.492 11.817,41.194 11.817,0.51 6.731,0.51 6.631,0.501 6.536,0.472 6.447,0.424 6.37,0.361 6.307,0.284 6.259,0.195 6.23,0.1 6.221,0 6.221,-5.205 0.51,-5.205 0.51,54.862 13.333,54.862
5VCC on 12VCC (split plane): 47.496,0 47.496,-5.205 41.658,-5.205 41.658,0 41.649,0.1 41.62,0.195 41.572,0.284 41.509,0.361 41.432,0.424 41.343,0.472 41.248,0.501 41.148,0.51 12.821,0.51 12.821,41.402 12.812,41.5 12.783,41.594 12.737,41.681 12.674,41.757 8.376,46.055 8.376,49.917 13.761,49.917 13.843,49.909 41.148,49.909 41.248,49.918 41.343,49.947 41.432,49.995 41.509,50.058 41.572,50.135 41.62,50.224 41.649,50.319 41.658,50.419 41.658,55.751 47.496,55.751

## Other copper
12VCC (plane layer: these items are gaps in the copper):
  lines w1: 12.319,0 12.319,41.402 7.874,45.847 7.874,50.419 12.573,50.419 14.097,50.419

## Silkscreen, mask and mechanical layers (free items; w line width, h text height)
Top Overlay:
  region: 28.194,35.306 31.242,35.306 32.004,34.544 32.004,28.956 31.242,28.194 28.194,28.194 27.432,28.956 27.432,34.544
  lines w1: 22.479,31.877 27.559,31.877 ; 23.876,24.638 28.067,28.829 ; 23.939,38.798 28.067,34.671 ; 31.242,34.544 35.687,38.989 ; 31.559,28.639 35.814,24.384 ; 31.623,31.75 36.703,31.75
  text "5VCC" at 19.758,45.292 h0.8 r270
  text "3VCC" at 22.225,45.212 h0.8 r270
  text "TXRASPI" at 31.188,45.165 h0.8 r270
  text "RXRASPI" at 33.728,45.165 h0.8 r270
  text "RXDEBUG" at 36.268,44.911 h0.8 r270
  text "TXDEBUG" at 38.935,44.911 h0.8 r270
  text "GND" at 24.511,43.688 h1.52
  text "HEXAPODO" at 21.717,21.971 h1.52
  text "JBC" at 33.147,19.812 h1.52
  text "S" at 30.48,6.223 h0.8
  text "DIR" at 32.385,6.223 h0.8
  text "TX" at 35.306,6.223 h0.8
  text "RX" at 37.846,6.223 h0.8